# Altium PCB PROC106B_ASCII.PcbDoc (part 2 of 8)
Units mil, origin at the board's own origin, x right, y up, seen from the top; angles counter-clockwise.
Board outline 4498.18 x 1060.53 mil, 8 copper layers (Top Layer, GND1, Sig1, PWR1, PWR2, Sig2, GND2, Bottom Layer), stack 69.602 mil thick; 439 components, 327 nets, 1548 pads, 843 vias.
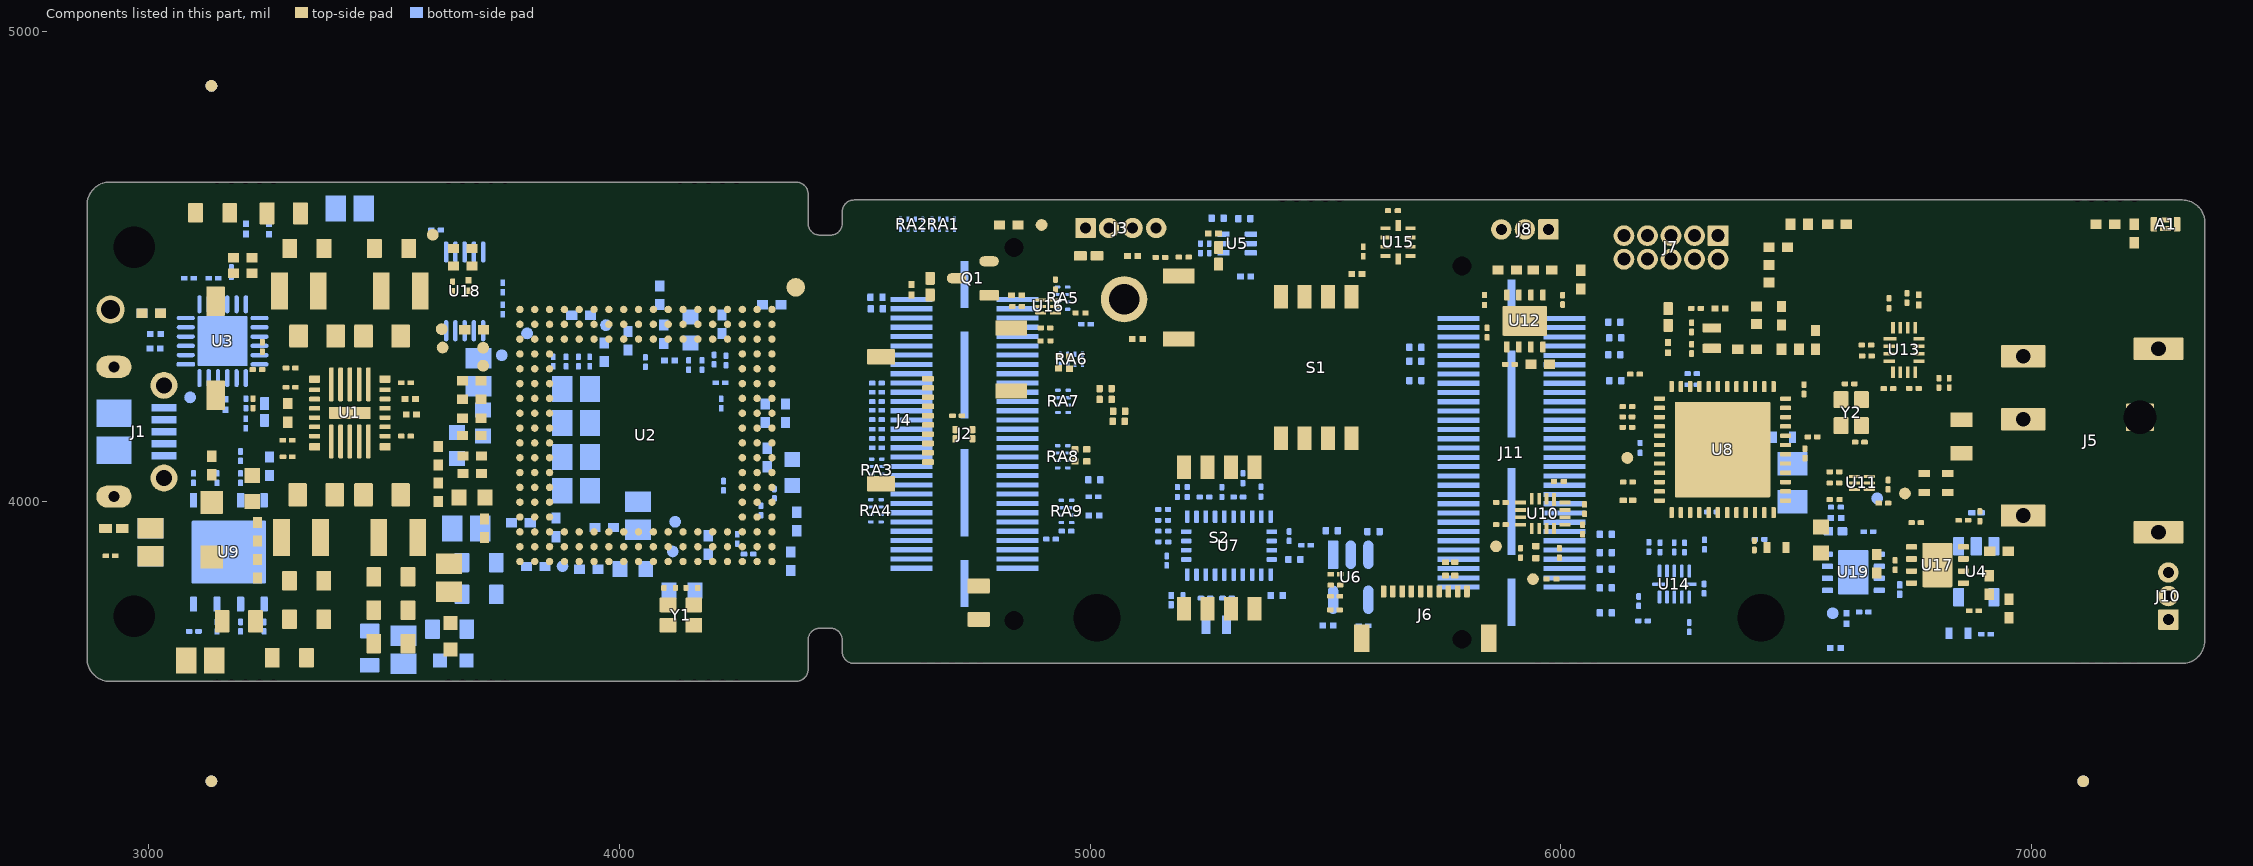
[diagram p8: the components of this part, seen from the top]

## Components (designator, comment, footprint, x,y, rotation, side; value= is the part's Value field where it differs from the comment) (continued)
C125 "CL03A103KA3NNNC" FP-CL03A103KA3NNNC_0201-IPC_C 5252.95,4538.7 r270 bottom
C126 "GCM155R71C104KA55D" 0402L 3691.38,4365.53 r180 top
C127 "GRM033R6YA104KE14D" "FP-GRM033R6YA104KE14D_0201 (0603 Metric)-IPC_C" 6653.18,3936.75 r180 bottom
C128 "GRM033R6YA104KE14D" "FP-GRM033R6YA104KE14D_0201 (0603 Metric)-IPC_C" 6643.28,3766.12 r180 bottom
C129 "CL03A105MO3NRNH" FP-CL03A105MO3NRNH_0201-IPC_C 6719.58,3813.74 r270 bottom
C130 "GCM155R71C104KA55D" 0402L 3967.83,4318.05 r90 bottom
C131 "CGA4J1X7T0J226M125AC" FP-CGA4J1X7T0J226M125AC_0805-MFG 3469.55,3689.64 r90 bottom
D1 "NRVB230LSFT1G" FP-NRVB230LSFT1G_SOD-123F-MFG 3134.01,3940.99 r90 top
Designator1 "Comment" MHNP_M2_PANHEAD_PHILLIPS 2983.52,4883.72 r0 top
Designator1_1 "BRAKE_WAY_HOLES1X2" BRAKE_WAY_HOLES1X2 3205.41,3572.64 r180 bottom
Designator1_2 "Comment" MHNP_M2_PANHEAD_PHILLIPS 2969.58,4541.42 r0 top
Designator2 "BRAKE_WAY_HOLES1X2" BRAKE_WAY_HOLES1X2 4188.97,4725.69 r180 top
Designator2_1 "BRAKE_WAY_HOLES1X2" BRAKE_WAY_HOLES1X2 6010.52,3609.79 r180 bottom
Designator3 "BRAKE_WAY_HOLES1X2" BRAKE_WAY_HOLES1X2 3697.19,4725.69 r180 top
Designator3_2 "BRAKE_WAY_HOLES1X2" BRAKE_WAY_HOLES1X2 5469.11,4687.74 r0 bottom
Designator4 "BRAKE_WAY_HOLES1X2" BRAKE_WAY_HOLES1X2 4706.5,3609.79 r0 top
Designator4_1 "BRAKE_WAY_HOLES1X2" BRAKE_WAY_HOLES1X2 3697.19,3572.64 r180 bottom
Designator5 "BRAKE_WAY_HOLES1X2" BRAKE_WAY_HOLES1X2 7157.87,4687.69 r180 top
Designator5_1 "BRAKE_WAY_HOLES1X2" BRAKE_WAY_HOLES1X2 7157.6,3609.79 r180 bottom
Designator5_2 "BRAKE_WAY_HOLES1X2" BRAKE_WAY_HOLES1X2 4188.97,3572.64 r180 bottom
Designator6 "Comment" MHNP_M2_PANHEAD_PHILLIPS 7259.4,4883.72 r0 top
Designator7 "Comment" MHNP_M2_PANHEAD_PHILLIPS 2983.52,3406.7 r0 top
Designator7_1 "Comment" MHNP_M2_PANHEAD_PHILLIPS 2969.58,3756.91 r0 top
Designator8 "Comment" MHNP_M2_PANHEAD_PHILLIPS 7259.4,3406.7 r0 top
Designator10 "BRAKE_WAY_HOLES1X2" BRAKE_WAY_HOLES1X2 3205.41,4725.69 r180 top
Designator22_1 "Comment" MHNP_2-5 6425,3754.06 r0 bottom
Designator23 "Comment" MHNP_2-5 5014.62,3754.06 r0 bottom
FID1 "Fiducial" FIDUCIAL6.4-20 3133.52,3406.7 r0 top
FID2 "Fiducial" FIDUCIAL6.4-20 3133.52,4883.72 r0 top
FID3 "Fiducial" FIDUCIAL6.4-20 7109.4,3406.7 r0 top
FID4 "Fiducial" FIDUCIAL6.4-20 7109.4,3406.7 r180 bottom
FID5 "Fiducial" FIDUCIAL6.4-20 3133.52,4883.72 r180 bottom
FID6 "Fiducial" FIDUCIAL6.4-20 3133.52,3406.7 r180 bottom
FL2 "BLM15PD300SZ1D" 0402L 3134.06,4077.41 r270 top
FL3 "BLM15PD300SZ1D" 0402L 6670.79,3868.56 r90 top
FL12 "BLM15PD300SZ1D" 0402L 5955.92,4292.41 r0 top
FL22 "BLM15PD300SZ1D" 0402L 4827.36,4588.36 r0 top
J1 "105017-0001" CONN_105017-0001 2979.51,4149.15 r90 bottom
J2 "QSH-030-01-L-D-A" Samtec_QSH-030-01-X-D-A 4733.36,4144.5 r0 bottom locked
J3 "M50-3930442" FP-M50-3930442_HDR4-RECOMMENDED_LAND_PATTERN 5065.29,4621.12 r0 bottom
J4 "51441-1093" FP-51441-1093_CONN_SMD_FFC-0 4585.45,4173.34 r270 top locked
J5 "PJ-051AH" CUI_PJ-051AH 7229.96,4179.69 r0 top
J6 "51441-1093" FP-51441-1093_CONN_SMD_FFC-0 5711.91,3740.17 r0 top
J7 "GRPB052MWCN-RC" FP-GRPB052MWCN-RC_HDR10-MFG 6233.84,4610.83 r180 top
J8 "M50-3930342" FP-M50-3930342_HDR3-MFG 5923.44,4618.25 r180 top
J10 "M50-3930342" FP-M50-3930342_HDR3-MFG 7329.6,3800 r90 top
J11 "QSH-030-01-L-D-A" Samtec_QSH-030-01-X-D-A 5895.12,4104.5 r180 bottom locked
L1 "LQG15HS2N4S02D" IND_LQG15H 6487.22,4324.41 r0 top
L2 "DFE252012PD-R47M" DFE252012P 3535.79,4447.85 r180 top
L3 "DFE252012PD-R47M" DFE252012P 3319.27,4447.85 r0 top
L4 "DFE252012PD-R47M" DFE252012P 3530.36,3924.63 r180 top
L5 "DFE252012PD-R47M" DFE252012P 3323.75,3924.63 r0 top
L6 "LQG15HS2N4S02D" IND_LQG15H 6415.18,4396.46 r90 top
L7 "MLZ2012N6R8LT000" 0805_HV 6491.96,4040.83 r90 bottom
L8 "BLM18HE152SN1D" 0603L 6552.57,3919.1 r90 top
L9 "LQG15HS2N0S02D" IND_LQG15H 6441.85,4484.72 r90 top
L10 "LQG15HS2N0S02D" IND_LQG15H 6506.46,4589.83 r0 top
L11 "MPZ2012S101ATD25" FP-MPZ2012S101ATD25_0805-MFG 3191.81,3746.61 r180 top
L12 "BLM18KG121TH1D" 0603_HV 3641.39,3714.72 r90 top
L13 "MPZ2012S101ATD25" FP-MPZ2012S101ATD25_0805-MFG 3287.13,4612.77 r0 top
L14 "BLM18KG121TH1D" 0603_HV 3647.19,3662.86 r180 bottom
L15 "MPZ2012S101ATD25" FP-MPZ2012S101ATD25_0805-MFG 6850.96,4138.99 r270 top
L16 "MPZ2012S101ATD25" FP-MPZ2012S101ATD25_0805-MFG 4763.29,3786.02 r270 top
LD1 "APHHS1005CGCK" APHHS1005_Green 2926.36,3943.79 r0 top
LD2 "APHHS1005CGCK" APHHS1005_Green 5272.84,4522.72 r270 top
LD3 "APHHS1005CGCK" APHHS1005_Green 4997.02,4522.72 r0 top
LD4 "APHHS1005CGCK" APHHS1005_Green 3246.44,4191.13 r270 bottom
LD5 "APHHS1005CGCK" APHHS1005_Green 4660.11,4457.37 r90 top
LD6 "APHHS1005CGCK" APHHS1005_Green 6227.85,4392.84 r90 top
Q1 "BSS123-7-F" FP-BSS123-7-F_SOT23-IPC_C 4750.81,4475.09 r180 top
R1 "RR0306P-103-D" FP-RR0306P-103-D_0201-IPC_C#1 5643.17,4618.56 r180 top
R2 "ERJ-1GN0R00C" 0201L 4106.92,4300.76 r180 bottom
R3 "ERA-1AEB103C" FP-ERA-1AEB103C_0201-IPC_C 4274.79,3889.16 r180 bottom
R4 "ERJ-1GNF1003C" FP-ERJ-1GNF1003C_0201-IPC_C 3752.34,4408.84 r270 bottom
R5 "ERJ-1GNF1003C" FP-ERJ-1GNF1003C_0201-IPC_C 3752.34,4455.46 r90 bottom
R6 "ERJ-1GNF33R2C" FP-ERJ-1GNF33R2C_0201-IPC_C 3095.35,4050.45 r270 bottom
R7 "ERA-1AEB103C" FP-ERA-1AEB103C_0201-IPC_C 4329.25,4017.43 r270 bottom
R8 "ERA-1AEB103C" FP-ERA-1AEB103C_0201-IPC_C 4221.23,4034.41 r270 bottom
R9 "ERJ-1GNF1003C" FP-ERJ-1GNF1003C_0201-IPC_C 4250.53,3921.56 r270 bottom
R10 "AC0201FR-0720RL" FP-AC0201FR-0720RL_0201-IPC_C 4917.01,3921 r180 bottom
R11 "AC0201FR-0720RL" FP-AC0201FR-0720RL_0201-IPC_C 4950.01,3937.94 r180 bottom
R12 "RC0201JR-070RL" "FP-RC0201JR-070RL_0201 (0603 Metric)-MFG" 4546.15,4434.59 r180 bottom
R13 "RC0201JR-07220RL" 0201L 5261.81,4570.64 r0 top
R14 "RC0201JR-070RL" "FP-RC0201JR-070RL_0201 (0603 Metric)-MFG" 4547.12,4410.25 r180 bottom
R15 "ERJ-1GNJ221C" FP-ERJ-1GNJ221C_0201-IPC_C 3206.52,4166.71 r90 bottom
R16 "RC0201FR-077K87L" 0201L 5566.39,4484.46 r180 top
R17 "RC0201JR-07220RL" 0201L 6227.85,4327.64 r90 top
R18 "RR0306P-103-D" FP-RR0306P-103-D_0201-IPC_C#1 5362.78,4021.8 r270 bottom
R19 "ERA-1AEB103C" FP-ERA-1AEB103C_0201-IPC_C 3610.73,4577.6 r180 bottom
R20 "RR0306P-103-D" FP-RR0306P-103-D_0201-IPC_C#1 6584.18,3988.94 r180 bottom
R21 "ERA-1AEB103C" FP-ERA-1AEB103C_0201-IPC_C 3859.46,4298.05 r270 bottom
R22 "ERA-1AEB103C" FP-ERA-1AEB103C_0201-IPC_C 3886.73,4298.05 r270 bottom
R23 "ERA-1AEB103C" FP-ERA-1AEB103C_0201-IPC_C 3913.05,4298.05 r270 bottom
R24 "CRCW0402200RFKEDHP" FP-CRCW0402200RFKEDHP_0402-IPC_C 6583.18,3937.46 r180 bottom
R25 "ERJ-1GNF4991C" FP-ERJ-1GNF4991C_0201-IPC_C 3301.93,4243.48 r180 top
R26 "ERJ-1GNF4991C" FP-ERJ-1GNF4991C_0201-IPC_C 3295.24,4131.09 r180 top
R27 "RC0201JR-07510RL" 0201L 6606.39,3752.54 r90 bottom
R28 "ERJ-1GN0R00C" 0201L 3555.87,4218.48 r180 top
R29 "CRCW0201100KFKED" 0201L 6584.18,3965.94 r180 bottom
R30 "RC0201JR-070RL" "FP-RC0201JR-070RL_0201 (0603 Metric)-MFG" 5946.67,3893.52 r90 top
R31 "ERJ-1GN0R00C" 0201L 5008.05,3971.4 r180 bottom
R32 "ERJ-1GN0R00C" 0201L 3558.22,4185.79 r180 top
R33 "ERJ-1GNF4991C" FP-ERJ-1GNF4991C_0201-IPC_C 3295.5,4095.96 r180 top
R34 "ERJ-1GNF4991C" FP-ERJ-1GNF4991C_0201-IPC_C 3546.86,4253.13 r0 top
R35 "ERA-1AEB103C" FP-ERA-1AEB103C_0201-IPC_C 3301.93,4284.61 r180 top
R36 "ERA-1AEB103C" FP-ERA-1AEB103C_0201-IPC_C 3546.86,4139.79 r0 top
R37 "ERJ-1GNF1003C" FP-ERJ-1GNF1003C_0201-IPC_C 5007.04,4011.07 r180 bottom
R38 "RC0201FR-074K99L" 0201L 5330.47,4478.82 r180 bottom
R39 "ERJ-1GNJ511C" FP-ERJ-1GNJ511C_0201-IPC_C 2919.28,3885.59 r180 top
R40 "ERJ-1GNF4991C" FP-ERJ-1GNF4991C_0201-IPC_C 3175.78,4488.13 r270 bottom
R41 "ERJ-1GN0R00C" 0201L 3013.92,4326.25 r180 bottom
R42 "RC0201JR-07220RL" 0201L 5090.29,4522.72 r0 top
R43 "ERA-1AEB103C" FP-ERA-1AEB103C_0201-IPC_C 3245.35,3734.95 r270 bottom
R44 "ERA-1AEB103C" FP-ERA-1AEB103C_0201-IPC_C 3095.98,3724.94 r180 bottom
R45 "ERA-1AEB103C" FP-ERA-1AEB103C_0201-IPC_C 3195.34,4097.11 r90 bottom
R46 "ERJ-1GNF33R2C" FP-ERJ-1GNF33R2C_0201-IPC_C 3195.35,3734.95 r90 bottom
R47 "ERJ-1GNF33R2C" FP-ERJ-1GNF33R2C_0201-IPC_C 3145.35,4050.45 r270 bottom
R48 "ERJ-1GNF33R2C" FP-ERJ-1GNF33R2C_0201-IPC_C 3145.35,3734.95 r90 bottom
R49 "ERJ-1GNF33R2C" FP-ERJ-1GNF33R2C_0201-IPC_C 3195.35,4050.45 r270 bottom
R50 "ERJ-1GNJ102C" FP-ERJ-1GNJ102C_0201-IPC_C 3241.63,4329.43 r90 top
R51 "RC0201JR-070RL" "FP-RC0201JR-070RL_0201 (0603 Metric)-MFG" 5327.6,4601.84 r0 bottom
R52 "ERJ-1GNF1961C" FP-ERJ-1GNF1961C_0201-IPC_C 3231.08,4281.06 r0 top
R53 "CRCW04023R83FKED" 0402L 3667.5,4501.24 r180 top
R54 "CRCW04023R83FKED" 0402L 3200.34,4485.56 r0 top
R55 "CRCW04023R83FKED" 0402L 3615.39,4020.22 r270 top
R56 "CRCW04023R83FKED" 0402L 3231.35,3858.36 r270 top
R57 "RC0201JR-070RL" "FP-RC0201JR-070RL_0201 (0603 Metric)-MFG" 5270.8,4602.69 r0 bottom
R58 "RC0201JR-070RL" "FP-RC0201JR-070RL_0201 (0603 Metric)-MFG" 5008.99,4046.94 r180 bottom
R59 "ERA-1AEB103C" FP-ERA-1AEB103C_0201-IPC_C 3936.98,4298.05 r270 bottom
R60 "ERJ-1GN0R00C" 0201L 3014.55,4356.6 r180 bottom
R61 "ERJ-1GN0R00C" 0201L 3163.55,4206.75 r90 bottom
R62 "ERJ-1GN0R00C" 0201L 3206.51,4580.21 r270 bottom
R63 "ERJ-1GN0R00C" 0201L 3255.87,4579.81 r270 bottom
R64 "ERJ-1GNF4991C" FP-ERJ-1GNF4991C_0201-IPC_C 3086.14,4475.15 r0 bottom
R65 "ERA-1AEB103C" FP-ERA-1AEB103C_0201-IPC_C 3137.8,4475.15 r180 bottom
R66 "RC0201JR-070RL" "FP-RC0201JR-070RL_0201 (0603 Metric)-IPC_C" 4991.42,4377.56 r0 bottom
R67 "RC0201JR-070RL" "FP-RC0201JR-070RL_0201 (0603 Metric)-MFG" 5513.34,3938.91 r0 bottom
R68 "RC0201JR-070RL" "FP-RC0201JR-070RL_0201 (0603 Metric)-MFG" 5601.88,3937.06 r180 bottom
R69 "RC0201FR-074K99L" 0201L 5505.11,3737.11 r180 bottom
R70 "RC0201JR-070RL" "FP-RC0201JR-070RL_0201 (0603 Metric)-MFG" 5434,3877.69 r0 bottom
R71 "RC0201JR-070RL" "FP-RC0201JR-070RL_0201 (0603 Metric)-MFG" 5396.26,3801.26 r0 bottom
R72 "RC0201JR-070RL" "FP-RC0201JR-070RL_0201 (0603 METRIC)-IPC_C" 5422.76,3927.24 r270 bottom
R73 "RC0201JR-070RL" "FP-RC0201JR-070RL_0201 (0603 METRIC)-IPC_C" 5458.86,3908 r180 bottom
R74 "RC0201JR-070RL" "FP-RC0201JR-070RL_0201 (0603 METRIC)-IPC_C" 6581.1,4063.92 r0 top
R75 "ERJ-1GNJ102C" FP-ERJ-1GNJ102C_0201-IPC_C 4300.76,3981.67 r270 bottom
R76 "RC0201JR-070RL" "FP-RC0201JR-070RL_0201 (0603 METRIC)-IPC_C" 6210.78,3903.45 r90 bottom
R77 "RR0306P-103-D" FP-RR0306P-103-D_0201-IPC_C#1 5185.3,4021 r270 bottom
R78 "RR0306P-103-D" FP-RR0306P-103-D_0201-IPC_C#1 5155,3984 r0 bottom
R79 "ERJ-1GNF4701C" FP-ERJ-1GNF4701C_0201-IPC_C 6304.11,3815.65 r270 bottom
R80 "RR0306P-103-D" FP-RR0306P-103-D_0201-IPC_C#1 5155.48,3915 r0 bottom
R81 "RR0306P-103-D" FP-RR0306P-103-D_0201-IPC_C#1 5324.41,4050.42 r270 bottom
R82 "RR0306P-103-D" FP-RR0306P-103-D_0201-IPC_C#2 5279.72,4021 r270 bottom
R83 "ERA-1AEB103C" FP-ERA-1AEB103C_0201-IPC_C 4055.26,4296.88 r270 bottom
R84 "ERA-1AEB103C" FP-ERA-1AEB103C_0201-IPC_C 4216.3,4208.84 r90 bottom
R85 "ERA-1AEB103C" FP-ERA-1AEB103C_0201-IPC_C 3645.85,4457.99 r270 top
R86 "RC0201JR-070RL" "FP-RC0201JR-070RL_0201 (0603 METRIC)-IPC_C" 6141.03,4180.57 r0 top
R87 "RC0201JR-070RL" "FP-RC0201JR-070RL_0201 (0603 METRIC)-IPC_C" 6141.18,4202.46 r0 top
R88 "AC0201FR-0720RL" FP-AC0201FR-0720RL_0201-IPC_C 4547.27,4114.97 r0 bottom
R89 "CRCW0201100KFKED" 0201L 6338.19,4411.08 r0 top
R90 "RC0201JR-070RL" "FP-RC0201JR-070RL_0201 (0603 METRIC)-IPC_C" 6278.99,4249 r0 bottom
R91 "RC0201JR-070RL" "FP-RC0201JR-070RL_0201 (0603 METRIC)-IPC_C" 6422.16,3920.53 r180 bottom
R92 "CRCW0201100KFKED" 0201L 6583.22,3689.74 r0 bottom
R93 "RR0306P-103-D" FP-RR0306P-103-D_0201-IPC_C#1 5206.3,4021 r90 bottom
R94 "RR0306P-103-D" FP-RR0306P-103-D_0201-IPC_C#1 5995.7,4043.69 r0 top
R95 "RR0306P-103-D" FP-RR0306P-103-D_0201-IPC_C#1 5979.95,3836.09 r0 top
R96 "RR0306P-103-D" FP-RR0306P-103-D_0201-IPC_C#1 5155.48,3938 r180 bottom
R97 "RC0201JR-070RL" "FP-RC0201JR-070RL_0201 (0603 METRIC)-IPC_C" 5314.73,4010.48 r0 bottom
R98 "RR0306P-103-D" FP-RR0306P-103-D_0201-IPC_C#1 5155,3961 r180 bottom
R99 "RC0201JR-070RL" "FP-RC0201JR-070RL_0201 (0603 METRIC)-IPC_C" 5996.83,3891.7 r270 top
R100 "RC0201JR-070RL" "FP-RC0201JR-070RL_0201 (0603 METRIC)-IPC_C" 5872.42,3998.82 r0 top
R101 "RC0201JR-070RL" "FP-RC0201JR-070RL_0201 (0603 METRIC)-IPC_C" 6046.19,3941.56 r270 top
R102 "RC0201JR-070RL" "FP-RC0201JR-070RL_0201 (0603 METRIC)-IPC_C" 6278.99,4272.45 r0 bottom
R103 "ERJ-1GN0R00C" 0201L 3679.35,4459.54 r270 top
R104 "RR0306P-103-D" FP-RR0306P-103-D_0201-IPC_C#1 6581.47,4005 r180 top
R105 "RC0201JR-070RL" "FP-RC0201JR-070RL_0201 (0603 METRIC)-IPC_C" 6685.03,3997.34 r180 top
R106 "RC0201JR-070RL" "FP-RC0201JR-070RL_0201 (0603 METRIC)-IPC_C" 6695.04,4036.52 r90 top
R107 "RC0201JR-07510RL" 0201L 4620.57,4450.68 r270 top
R108 "RC0201JR-07510RL" 0201L 4843.99,4439.06 r180 top
R110 "RR0306P-103-D" FP-RR0306P-103-D_0201-IPC_C#1 6168.27,4114.75 r270 bottom
R111 "RC0201JR-07220RL" 0201L 5100.51,4345.88 r180 top
R112 "RC0201JR-070RL" "FP-RC0201JR-070RL_0201 (0603 METRIC)-IPC_C" 5872.42,3951.7 r0 top
R113 "RC0201JR-070RL" "FP-RC0201JR-070RL_0201 (0603 METRIC)-IPC_C" 5914.31,3891.7 r90 top
R114 "CRCW040261R9FKED" 0402L 6930.63,3895.33 r180 top
R115 "RC0201JR-070RL" "FP-RC0201JR-070RL_0201 (0603 Metric)-IPC_C" 6854.79,3961 r0 top
R116 "RC0201JR-070RL" "FP-RC0201JR-070RL_0201 (0603 Metric)-IPC_C" 6754.79,3956 r0 top
R117 "CRCW040261R9FKED" 0402L 6909.66,3823.52 r270 top
R118 "RR0306P-103-D" FP-RR0306P-103-D_0201-IPC_C#1 6696.81,4422 r90 top
R119 "CRCW040261R9FKED" 0402L 5885.96,4492.77 r0 top
R120 "RC0201JR-070RL" "FP-RC0201JR-070RL_0201 (0603 Metric)-IPC_C" 6802.81,4252.99 r90 top
R121 "RC0201JR-070RL" "FP-RC0201JR-070RL_0201 (0603 METRIC)-IPC_C" 6649.04,4333.23 r180 top
R122 "RR0306P-103-D" FP-RR0306P-103-D_0201-IPC_C#1 5837.64,4429.06 r270 top
R123 "RC0201JR-070RL" "FP-RC0201JR-070RL_0201 (0603 METRIC)-IPC_C" 5843.14,4359.71 r90 top
R124 "RR0306P-103-D" FP-RR0306P-103-D_0201-IPC_C#1 4905.31,4342.12 r0 top
R125 "RR0306P-103-D" FP-RR0306P-103-D_0201-IPC_C#1 5198.85,4520.03 r180 top
R126 "CRCW040261R9FKED" 0402L 5960.92,4492.48 r0 top
R127 "RC0201JR-070RL" "FP-RC0201JR-070RL_0201 (0603 METRIC)-IPC_C" 6649.8,4310 r0 top
R128 "RC0201JR-070RL" "FP-RC0201JR-070RL_0201 (0603 METRIC)-IPC_C" 6695.72,4240.71 r180 top
R129 "RC0201JR-070RL" "FP-RC0201JR-070RL_0201 (0603 METRIC)-IPC_C" 5149.26,4519.45 r180 top
R130 "AC0201FR-0720RL" FP-AC0201FR-0720RL_0201-IPC_C 4547.27,4134.63 r0 bottom
R131 "RC0201JR-070RL" "FP-RC0201JR-070RL_0201 (0603 METRIC)-IPC_C" 6321.17,3978.41 r180 bottom
R132 "AC0201FR-0720RL" FP-AC0201FR-0720RL_0201-IPC_C 4547.27,4154.34 r0 bottom
R133 "AC0201FR-0720RL" FP-AC0201FR-0720RL_0201-IPC_C 4547.27,4174.75 r0 bottom
R134 "RR0306P-103-D" FP-RR0306P-103-D_0201-IPC_C#1 6889.73,3969.51 r90 top
R135 "AC0201FR-0720RL" FP-AC0201FR-0720RL_0201-IPC_C 4547.27,4194.78 r0 bottom
R136 "RC0201JR-070RL" "FP-RC0201JR-070RL_0201 (0603 Metric)-IPC_C" 6749.82,4241 r0 top
R137 "AC0201FR-0720RL" FP-AC0201FR-0720RL_0201-IPC_C 4547.27,4213.11 r0 bottom
R138 "AC0201FR-0720RL" FP-AC0201FR-0720RL_0201-IPC_C 4547.27,4233.08 r0 bottom
R139 "RC0201JR-070RL" "FP-RC0201JR-070RL_0201 (0603 Metric)-IPC_C" 6824.81,4252.99 r270 top
R140 "AC0201FR-0720RL" FP-AC0201FR-0720RL_0201-IPC_C 4547.27,4252.4 r0 bottom
R141 "RC0201FR-074K99L" 0201L 6760.03,4429.26 r90 top
R142 "RC0201JR-070RL" "FP-RC0201JR-070RL_0201 (0603 Metric)-MFG" 4992.71,4098.76 r270 top
R143 "RC0201JR-070RL" "FP-RC0201JR-070RL_0201 (0603 Metric)-MFG" 4967.77,4098.76 r270 top
R144 "RC0201JR-070RL" "FP-RC0201JR-070RL_0201 (0603 Metric)-MFG" 5061.58,4192.66 r0 top
R145 "RC0201JR-070RL" "FP-RC0201JR-070RL_0201 (0603 Metric)-MFG" 5060.48,4171.22 r0 top
R146 "RC0201JR-070RL" "FP-RC0201JR-070RL_0201 (0603 Metric)-MFG" 5032.8,4217.79 r0 top
R147 "RC0201JR-070RL" "FP-RC0201JR-070RL_0201 (0603 Metric)-MFG" 5032.8,4240.79 r0 top
R148 "RC0201JR-070RL" "FP-RC0201JR-070RL_0201 (0603 Metric)-MFG" 4932.76,4296.62 r90 top
R149 "RC0201JR-070RL" "FP-RC0201JR-070RL_0201 (0603 Metric)-MFG" 4956.17,4295.87 r90 top
R150 "RC0201JR-070RL" "FP-RC0201JR-070RL_0201 (0603 Metric)-MFG" 6113.61,4381.76 r0 bottom
R151 "RC0201JR-070RL" "FP-RC0201JR-070RL_0201 (0603 Metric)-MFG" 6115.41,4348.48 r0 bottom
R152 "RC0201JR-070RL" "FP-RC0201JR-070RL_0201 (0603 Metric)-MFG" 5690.93,4328.4 r0 bottom
R153 "RC0201JR-070RL" "FP-RC0201JR-070RL_0201 (0603 Metric)-MFG" 6113.32,4312.59 r0 bottom
R154 "RC0201JR-070RL" "FP-RC0201JR-070RL_0201 (0603 Metric)-MFG" 5690.93,4298.93 r0 bottom
R155 "RC0201JR-070RL" "FP-RC0201JR-070RL_0201 (0603 Metric)-MFG" 6115.55,4257.57 r0 bottom
R157 "RC0201JR-070RL" "FP-RC0201JR-070RL_0201 (0603 Metric)-MFG" 5690.93,4257.72 r0 bottom
R158 "ERJ-1GNF8252C" FP-ERJ-1GNF8252C_0201-IPC_C 4175.56,4290.74 r270 bottom
R159 "ERJ-1GNJ751C" FP-ERJ-1GNJ751C_0201-IPC_C 4201.23,4302.15 r90 bottom
R160 "RC0201JR-070RL" "FP-RC0201JR-070RL_0201 (0603 METRIC)-IPC_C" 6262.64,3903.15 r90 bottom
R161 "RC0201JR-070RL" "FP-RC0201JR-070RL_0201 (0603 METRIC)-IPC_C" 6141.18,4158.46 r0 top
R166 "RC0201JR-070RL" "FP-RC0201JR-070RL_0201 (0603 METRIC)-IPC_C" 6240.62,3903.59 r90 bottom
R168 "RC0201JR-070RL" "FP-RC0201JR-070RL_0201 (0603 METRIC)-IPC_C" 6186.75,3904.39 r90 bottom
R170 "ERJ-1GNF8252C" FP-ERJ-1GNF8252C_0201-IPC_C 4214.74,4253.13 r180 bottom
R171 "ERJ-1GNJ751C" FP-ERJ-1GNJ751C_0201-IPC_C 4226.45,4300.41 r90 bottom
R172 "ERJ-1GNF8252C" FP-ERJ-1GNF8252C_0201-IPC_C 3206.71,4209.45 r270 bottom
R174 "ERJ-1GNF7871C" FP-ERJ-1GNF7871C_0201-IPC_C 4147.23,4290.74 r270 bottom
R176 "ERJ-1GNF7871C" FP-ERJ-1GNF7871C_0201-IPC_C 3221.71,4209.45 r270 top
R177 "RR0306P-103-D" FP-RR0306P-103-D_0201-IPC_C#1 4979.62,4401.5 r180 top
R178 "RR0306P-103-D" FP-RR0306P-103-D_0201-IPC_C#1 4926.29,4461.7 r270 top
R180 "ERJ-1GNF4701C" FP-ERJ-1GNF4701C_0201-IPC_C 6165.19,3789.15 r270 bottom
R181 "ERJ-1GNF4701C" FP-ERJ-1GNF4701C_0201-IPC_C 5520.05,3770.65 r180 top
R182 "RC0201JR-070RL" "FP-RC0201JR-070RL_0201 (0603 METRIC)-IPC_C" 4717.71,4183.18 r180 top
R183 "RC0201JR-070RL" "FP-RC0201JR-070RL_0201 (0603 METRIC)-IPC_C" 5520.61,3799.62 r180 top
R184 "RC0201JR-070RL" "FP-RC0201JR-070RL_0201 (0603 METRIC)-IPC_C" 5521.16,3823.28 r180 top
R185 "RC0201JR-070RL" "FP-RC0201JR-070RL_0201 (0603 METRIC)-IPC_C" 5521,3846.49 r180 top
R186 "RC0201JR-070RL" "FP-RC0201JR-070RL_0201 (0603 Metric)-MFG" 6095.54,3931.22 r0 bottom
R187 "RC0201JR-070RL" "FP-RC0201JR-070RL_0201 (0603 Metric)-MFG" 6095.54,3892.26 r0 bottom
R188 "RC0201JR-070RL" "FP-RC0201JR-070RL_0201 (0603 Metric)-MFG" 6095.54,3857.41 r0 bottom
R189 "RC0201JR-070RL" "FP-RC0201JR-070RL_0201 (0603 Metric)-MFG" 6095.54,3817.56 r0 bottom
R190 "RC0201JR-070RL" "FP-RC0201JR-070RL_0201 (0603 Metric)-MFG" 6095.54,3764.53 r0 bottom
RA1 "EXB-18VR000X" FP-EXB-18VR000X_0502-MFG 4688.09,4589.75 r0 bottom
RA2 "EXB-18VR000X" FP-EXB-18VR000X_0502-MFG 4620.86,4589.75 r0 bottom
RA3 "EXB-18VR000X" FP-EXB-18VR000X_0502-MFG 4546.77,4067.23 r90 bottom
RA4 "EXB-18VR000X" FP-EXB-18VR000X_0502-MFG 4545.1,3981.11 r90 bottom
RA5 "EXB-18VR000X" FP-EXB-18VR000X_0502-MFG 4941.51,4432.71 r90 bottom locked
RA6 "EXB-18VR000X" FP-EXB-18VR000X_0502-MFG 4960.21,4302.91 r0 bottom
RA7 "EXB-18VR000X" FP-EXB-18VR000X_0502-MFG 4942.52,4213.65 r90 bottom locked
RA8 "EXB-18VR000X" FP-EXB-18VR000X_0502-MFG 4941.86,4095.87 r90 bottom locked
RA9 "EXB-18VR000X" FP-EXB-18VR000X_0502-MFG 4949.85,3979.76 r90 bottom locked
S1 "218-4LPST" SW_218-4LPST 5480.37,4285.46 r90 top
S2 "218-4LPST" SW_218-4LPST 5274.37,3923.46 r90 top locked
S3 "CHS-01TA" FP-CHS-01TA_SMT_SW_5MM4_2MM5-MFG 3142.31,4326.42 r90 top
SW2 "B3U-1000P" SW_B3U-1000P 4832.84,4302.77 r270 top
SW3 "B3U-1000P" SW_B3U-1000P 5188.73,4412.81 r270 top
TP2 "TESTPOINT" TP_25MIL-SMT 4113.44,3894.78 r180 bottom
TP3 "TESTPOINT" TP_25MIL-SMT 4118.39,3957.8 r180 bottom
TP4 "TESTPOINT" TP_25MIL-SMT 6671.71,4007.65 r180 bottom
TP5 "TESTPOINT" TP_25MIL-SMT 3603.84,4567.52 r180 top
TP6 "TESTPOINT" TP_25MIL-SMT 3750.12,4311.58 r90 bottom
TP7 "TESTPOINT" TP_25MIL-SMT 3804,4358 r0 bottom
TP8 "TESTPOINT" TP_25MIL-SMT 3710.6,4327.53 r0 top
TP9 "TESTPOINT" TP_25MIL-SMT 3710.6,4289.4 r0 top
TP10 "TESTPOINT" TP_25MIL-SMT 6577.18,3763.46 r270 bottom
TP11 "TP_SM_1MM" TP_SM_1MM 4374.76,4455.87 r180 top
TP12 "TESTPOINT" TP_VIA_060RND040 2919.28,4408.64 r90 top
TP13 "TESTPOINT" TP_25MIL-SMT 4896.84,4588.36 r270 top
TP14 "TESTPOINT" TP_25MIL-SMT 3971.52,4375.57 r270 bottom
TP15 "TESTPOINT" TP_25MIL-SMT 6730.81,4018 r90 top
TP16 "TESTPOINT" TP_25MIL-SMT 6141.18,4093.46 r180 top
TP17 "TESTPOINT" TP_25MIL-SMT 3879.25,3863.39 r180 bottom
TP18 "TESTPOINT" TP_25MIL-SMT 3622.56,4367.08 r180 top
TP19 "TESTPOINT" TP_25MIL-SMT 3624.53,4327.96 r180 top
TP20 "4953" FP-4953_HDR1-MFG 5072.16,4430.47 r180 bottom locked
TP26 "TESTPOINT" TP_25MIL-SMT 3088.22,4222.02 r0 bottom
TP27 "TESTPOINT" TP_25MIL-SMT 5862.18,3905.74 r270 top
TP46 "TESTPOINT" TP_25MIL-SMT 5940.71,3836.09 r270 top
U1 "LP87524JRNFRQ1" RNF0026C 3427.48,4189 r180 top
U2 "AWR1843AoPBGALP" ALP0180A-MFG 4056.48,4141.13 r180 top
U3 "CP2105-F01-GMR" FP-CP2105-F01-GMR_QFN24-EP-IPC_A 3157.31,4341.42 r0 bottom
U4 "TPS79330DBVR" DBV0005A_N 6882.18,3851.63 r270 bottom
U5 "TMP112AQDRLRQ1" DRL0006A 5312.36,4548.71 r180 bottom
U6 "CAT24C08TDI-GT3" FP-CAT24C08TDI-GT3_TSOT-23-5-IPC_A 5553.54,3840.01 r270 bottom
U7 "BNO085" FP-BNO085_LGA28-MFG 5294.88,3907.22 r270 bottom
U8 "CC2642R1FRGZR" RGZ0048A 6343.38,4111.11 r270 top
U9 "MX25V1635FZNQ" WSON-8L_6x5MM_EP 3170.35,3893.29 r90 bottom locked
U10 "TCA6408ARSVR" RSV0016A 5961.56,3975.2 r270 top
U11 "SN74LVC1G3157DSFR" DSF0006A 6639.32,4040.29 r180 top
U12 "TCAN1042HGVDRBRQ1" DRB0008F 5923.44,4384.46 r90 top
U13 "TS3A5018RSVR" RSV0016A 6728.94,4322.76 r0 top
U14 "TXB0104QRUTRQ1" RUT0012A 6241.04,3825.36 r90 bottom
U15 "TS5A23157RSER" RSE0010A 5654.19,4551.79 r180 top
U16 "SN74LVC1G11DSFR" DSF0006A-MFG 4910.54,4415.28 r180 top
U17 "TCAN1042HGVDRBRQ1" DRB0008F 6799.78,3866 r0 top
U18 "TS5A23157QDGSRQ1" DGS0010A_L 3671.35,4447.33 r270 bottom
U19 "TPS2115ADRBR" DRB0008B 6621.18,3850.46 r0 bottom
Y1 "FW4000044Q" FP-FW4000044Q_4-SMD-2.0x1.6mm-MFG 4130.76,3759.63 r180 top
Y2 "CX2016DB48000C0WPLA2" FP-CX2016DB48000C0WPLA2_SMD4-MFG 6616.71,4189.85 r270 top
Y3 "ABS05W-32.768KHZ-D-2-T" FP-ABS05W-32.768KHZ-D-2-T_XTAL_SMT_1MM6_1MM0-MFG 6320.71,4347.93 r270 top
Y4 "ABS05W-32.768KHZ-D-2-T" FP-ABS05W-32.768KHZ-D-2-T_XTAL_SMT_1MM6_1MM0-MFG 5267.82,3738.88 r0 bottom
ZZ1 "This Assembly Note is for PCB labels only" AssemblyNoteLabel 2349.62,2814.36 r0 top
ZZ2 "These assemblies are ESD sensitive, ESD precautions shall be observed." AssemblyNote 2346.49,2738.89 r0 top
ZZ3 "These assemblies must be clean and free from flux and all contaminants. Use of no clean flux is not acceptable." AssemblyNote 2346.43,2653.5 r0 top
ZZ4 "These assemblies must comply with workmanship standards IPC-A-610 Class 2, unless otherwise specified." AssemblyNote 2343.34,2567.2 r0 top
ZZ5.1 "Cut the thermal pad(Part Number#GPVOUS-0.125-AC-0816) for the shape and size of the inner surface of the heatsink(Part Number#MCH065) and paste it on the inner surface of the heatsink;" AssemblyNote 2340.76,2492.7 r0 top
ZZ5.2 "Bring the heatsink onto the PCB bottom side (Opposite side of AOP device). Match the teeth in the heatsink with break-away area in the PCB and press the heatsink onto the PCB slightly so as thermal pad is spread all over the area" AssemblyNote 2343.41,2409 r0 top

## Footprints (in the part's own frame and the unit in brackets; to place one, negate y for a bottom-side part, rotate by r counter-clockwise, add the part's x,y. Pads: shape width x height; smd on the part's side, far side on the other; paste and mask are expansions set on the pad)
0201L [mm] "Data from Kemet datasheet CC101_COM dated 7/28/11"
  rect 0.36x0.32 smd mask+0: 1(-0.28,0) 2(0.28,0)
0402_070 [mil] "SMD, 2-Leads, Body 1.2x0.7mm, Height 0.7mm"
  rect 15x24 smd: 1(-20,0) 2(20,0)
0402L [mm] "0402 from SM-752 data"
  rect 0.6x0.5 smd: 1(-0.5,0) 2(0.5,0)
0402S [mil] "Based on C0402S footprint from PADS legacy"
  rect 15x24 smd: 1(-20,0) 2(20,0)
0603_HV [mil] "Ernesto recommended land pattern.  26 mil between pads."
  rect 30x30 smd: 1(-28,0) 2(28,0)
  silkscreen extent -52,-24 52,24
0603L [mm] "0603 from SM-752 data"
  rect 0.8x0.85 smd: 1(-0.7,0) 2(0.7,0)
  silkscreen extent -0.07,-0.33 0.07,0.33
0805_HV [mil] "0805 with 30mil clearance between pads"
  rect 50x63 smd: 1(-40,0) 2(40,0)
  silkscreen extent -74,-40 74,40
0805_HV1 [mm] "Custom footprint based on analyzing multiple manufacturer recommendations"
  rrect10% 1x1.25 smd: 1(-1,0) 2(1,0)
  silkscreen extent -0.2,-0.75 0.2,0.75
0805L [mm] "0805 from SM-752 data"
  rect 1.1x1.4 smd: 1(-0.75,0) 2(0.75,0)
ALP0180A-MFG [mm]
  round 0.4 smd paste+0 mask+0: A1(-6.8,6.8) A2(-6,6.8) A3(-5.2,6.8) A4(-4.4,6.8) A5(-3.6,6.8) A6(-2.8,6.8) A7(-2,6.8) A8(-1.2,6.8) A9(-0.4,6.8) A10(0.4,6.8) A11(1.2,6.8) A12(2,6.8) A13(2.8,6.8) A14(3.6,6.8) A15(4.4,6.8) A16(5.2,6.8) A17(6,6.8) A18(6.8,6.8) B1(-6.8,6) B2(-6,6) B3(-5.2,6) B4(-4.4,6) B5(-3.6,6) B6(-2.8,6) B7(-2,6) B8(-1.2,6) B9(-0.4,6) B10(0.4,6) B11(1.2,6) B12(2,6) B13(2.8,6) B14(3.6,6) B15(4.4,6) B16(5.2,6) B17(6,6) B18(6.8,6) C1(-6.8,5.2) C2(-6,5.2) C3(-5.2,5.2) C4(-4.4,5.2) C5(-3.6,5.2) C6(-2.8,5.2) C7(-2,5.2) C8(-1.2,5.2) C9(-0.4,5.2) C10(0.4,5.2) C11(1.2,5.2) C12(2,5.2) C13(2.8,5.2) C14(3.6,5.2) C15(4.4,5.2) C16(5.2,5.2) C17(6,5.2) C18(6.8,5.2) D1(-6.8,4.4) D2(-6,4.4) D3(-5.2,4.4) D16(5.2,4.4) D17(6,4.4) D18(6.8,4.4) E1(-6.8,3.6) E2(-6,3.6) E3(-5.2,3.6) E16(5.2,3.6) E17(6,3.6) E18(6.8,3.6) F1(-6.8,2.8) F2(-6,2.8) F3(-5.2,2.8) F16(5.2,2.8) F17(6,2.8) F18(6.8,2.8) G1(-6.8,2) G2(-6,2) G3(-5.2,2) G16(5.2,2) G17(6,2) G18(6.8,2) H1(-6.8,1.2) H2(-6,1.2) H3(-5.2,1.2) H16(5.2,1.2) H17(6,1.2) H18(6.8,1.2) J1(-6.8,0.4) J2(-6,0.4) J3(-5.2,0.4) J16(5.2,0.4) J17(6,0.4) J18(6.8,0.4) K1(-6.8,-0.4) K2(-6,-0.4) K3(-5.2,-0.4) K16(5.2,-0.4) K17(6,-0.4) K18(6.8,-0.4) L1(-6.8,-1.2) L2(-6,-1.2) L3(-5.2,-1.2) L16(5.2,-1.2) L17(6,-1.2) L18(6.8,-1.2) M1(-6.8,-2) M2(-6,-2) M3(-5.2,-2) M16(5.2,-2) M17(6,-2) M18(6.8,-2) N1(-6.8,-2.8) N2(-6,-2.8) N3(-5.2,-2.8) N16(5.2,-2.8) N17(6,-2.8) N18(6.8,-2.8) P1(-6.8,-3.6) P2(-6,-3.6) P3(-5.2,-3.6) P16(5.2,-3.6) P17(6,-3.6) P18(6.8,-3.6) R1(-6.8,-4.4) R2(-6,-4.4) R3(-5.2,-4.4) R16(5.2,-4.4) R17(6,-4.4) R18(6.8,-4.4) T1(-6.8,-5.2) T2(-6,-5.2) T3(-5.2,-5.2) T4(-4.4,-5.2) T5(-3.6,-5.2) T6(-2.8,-5.2) T7(-2,-5.2) T8(-1.2,-5.2) T9(-0.4,-5.2) T10(0.4,-5.2) T11(1.2,-5.2) T12(2,-5.2) T13(2.8,-5.2) T14(3.6,-5.2) T15(4.4,-5.2) T16(5.2,-5.2) T17(6,-5.2) T18(6.8,-5.2) U1(-6.8,-6) U2(-6,-6) U3(-5.2,-6) U4(-4.4,-6) U5(-3.6,-6) U6(-2.8,-6) U7(-2,-6) U8(-1.2,-6) U9(-0.4,-6) U10(0.4,-6) U11(1.2,-6) U12(2,-6) U13(2.8,-6) U14(3.6,-6) U15(4.4,-6) U16(5.2,-6) U17(6,-6) U18(6.8,-6) V1(-6.8,-6.8) V2(-6,-6.8) V3(-5.2,-6.8) V4(-4.4,-6.8) V5(-3.6,-6.8) V6(-2.8,-6.8) V7(-2,-6.8) V8(-1.2,-6.8) V9(-0.4,-6.8) V10(0.4,-6.8) V11(1.2,-6.8) V12(2,-6.8) V13(2.8,-6.8) V14(3.6,-6.8) V15(4.4,-6.8) V16(5.2,-6.8) V17(6,-6.8) V18(6.8,-6.8)
  silkscreen extent -8.3,-7.55 7.55,7.55
APHHS1005_Green [mm] "SMD, 2-Leads, Body 1x0.5mm"
  rrect20% 0.7x0.5 smd: 1(-0.45,0) 2(0.45,0)
  silkscreen extent -0.8,-0.65 1.12,0.65
AssemblyNote [mil] "Assembly Note"
AssemblyNoteLabel [mil] "Assembly Note for PCB Labels"
BRAKE_WAY_HOLES1X2 [mil]
CONN_105017-0001 [mm] "Molex Micro USB-B"
  rect 0.4x1.35 smd: 1(-1.3,1.35) 2(-0.65,1.35) 3(0,1.35) 4(0.65,1.35) 5(1.3,1.35)
  oval 1.2x1.9 hole 0.6 slot 1.3 at 90 deg: 6(-3.5,-1.35) 9(3.5,-1.35)
  rect 1.5x1.9 smd: 7(-1,-1.35) 8(1,-1.35)
  round 1.45 hole 0.85: 10(2.5,1.35) 11(-2.5,1.35)
  Top Layer region: 3.5,-2.3 2.3,-2.3 2.3,-0.4 3.5,-0.4
  Top Layer region: -3.5,-0.4 -2.3,-0.4 -2.3,-2.3 -3.5,-2.3
  silkscreen extent -4.1,-0.2 4.1,1.4
CUI_PJ-051AH [mm] "DC Power Jack, R/A, TH"
  rrect8% 2.4x1.2 hole 0.8 square: 1(-6.3,3.3) 2(-6.3,-5.3) 3(-6.3,-0.1)
  rrect8% 2.7x1.2 hole 0.8 square: 4(1,-6.2) 5(1,3.7)
  rrect7% 1.5x1.5 hole 1.8 square unplated mask+0: MH1(0,0)
DBV0005A_N [mm] "SOT23, 5-Leads, Body 2.9x1.6mm, Pitch 0.95mm, Lead Span 2.8mm, IPC Medium Density"
  rrect17% 1x0.6 smd: 1(-1.375,0.95) 2(-1.375,0) 3(-1.375,-0.95) 4(1.375,-0.95) 5(1.375,0.95)
  silkscreen extent -0.25,-1.55 0.25,1.55
DFE252012P [mm] "TOKO, Pad sizes increased as per request"
  rect 0.9x2 smd: 1(-1.05,0) 2(1.05,0)
  silkscreen extent -0.3,-1.2 0.3,1.2
DGS0010A_L [mm] "TSSOP, 10-Leads, Body 3x3mm, Pitch 0.5mm, IPC High Density"
  oval 1.15x0.25 smd: 1(-2.125,1) 2(-2.125,0.5) 3(-2.125,0) 4(-2.125,-0.5) 5(-2.125,-1) 6(2.125,-1) 7(2.125,-0.5) 8(2.125,0) 9(2.125,0.5) 10(2.125,1)
  silkscreen extent -2.65,-1.55 0.9,1.55
DRB0008B [mm] "SON, 8-Leads, Body 3x3mm, Pitch 0.65mm, Thermal Pad 2.4x1.65mm, TI Recommended"
  rrect33% 0.6x0.3 smd: 1(-1.4,0.975) 2(-1.4,0.325) 3(-1.4,-0.325) 4(-1.4,-0.975) 5(1.4,-0.975) 6(1.4,-0.325) 7(1.4,0.325) 8(1.4,0.975)
  rrect9% 1.47x1.06 on Bottom Paste: 9(0,-0.63) 9(0,0.63)
  rrect6% 1.65x2.4 smd paste-1.2: 9(0,0)
  silkscreen extent -1.73,-1.73 1.73,1.73
DRB0008F [mm] "SON, 8-Leads, Body 3x3mm, Pitch 0.65mm, Thermal Pad 2.4x1.6mm, TI Recommended"
  rrect33% 0.6x0.3 smd: 1(-1.4,0.975) 2(-1.4,0.325) 3(-1.4,-0.325) 4(-1.4,-0.975) 5(1.4,-0.975) 6(1.4,-0.325) 7(1.4,0.325) 8(1.4,0.975)
  rrect9% 1.47x1.07 on Top Paste: 9(0,0.635) 9(0,-0.635)
  rrect6% 1.6x2.4 smd paste-1.2: 9(0,0)
  silkscreen extent -1.73,-1.73 1.73,1.73
DRL0006A [mm] "SOTFL, 6-Flat Leads, Body 1.2x1.6x0.6mm, Pitch 0.5mm, TI recommended"
  rrect33% 0.67x0.3 smd: 1(-0.74,0.5) 2(-0.74,0) 3(-0.74,-0.5) 4(0.74,-0.5) 5(0.74,0) 6(0.74,0.5)
  silkscreen extent -0.9,-0.95 0.5,0.95
DSF0006A [mm] "TI recommended land pattern"
  rrect59% 0.6x0.17 smd mask+0: 1(-0.4,0.35) 2(-0.4,0) 3(-0.4,-0.35) 4(0.4,-0.35) 5(0.4,0) 6(0.4,0.35)
  silkscreen extent -0.6,-0.63 0.6,0.63
DSF0006A-MFG [mm]
  rrect59% 0.6x0.17 smd paste+0 mask+0: 1(-0.4,0.35) 2(-0.4,0) 3(-0.4,-0.35) 4(0.4,-0.35) 5(0.4,0) 6(0.4,0.35)
  silkscreen extent -1.14,-0.85 0.53,1.02
FIDUCIAL6.4-20 [mil]
  round 25 smd mask+0: 1(0,0)
FP-250R05L120JV4T_0201-IPC_C [mm]
  rrect38% 0.363x0.263 smd paste+0 mask+0: 1(-0.25,0) 2(0.25,0)
FP-4953_HDR1-MFG [mm]
  round 2.5 hole 1.65 paste-1000 mask+0: 1(0,0)
FP-51441-1093_CONN_SMD_FFC-0 [mm]
  rrect33% 0.3x0.65 smd paste+0 mask+0: 1(-2.25,1.775) 2(-1.75,1.775) 3(-1.25,1.775) 4(-0.75,1.775) 5(-0.25,1.775) 6(0.25,1.775) 7(0.75,1.775) 8(1.25,1.775) 9(1.75,1.775) 10(2.25,1.775)
  rrect12% 0.85x1.5 smd paste+0 mask+0: 11(-3.425,-0.75) 12(3.425,-0.75)
FP-ABS05W-32.768KHZ-D-2-T_XTAL_SMT_1MM6_1MM0-MFG [mm]
  rrect20% 0.5x1 smd paste+0 mask+0: 1(-0.55,0) 2(0.55,0)
FP-AC0201FR-0720RL_0201-IPC_C [mil]
  rrect38% 13.94x10.34 smd paste+0 mask+0: 1(-10.01,0) 2(10.01,0)
FP-ANT016008LCS2442MA2_SMT_ANT-0 [mm]
  rrect29% 0.35x0.8 smd paste+0 mask+0: 1(-0.625,0) 4(0.625,0)
  rrect38% 0.6x0.26 smd paste+0 mask+0: 2-3(0,-0.235) 5-6(0,0.235)
FP-BNO085_LGA28-MFG [mm]
  rrect40% 0.675x0.25 smd paste+0 mask+0: 1(1.562,2.25) 6(-1.562,2.25) 7(-1.562,1.75) 8(-1.562,1.25) 9(-1.562,0.75) 10(-1.562,0.25) 11(-1.562,-0.25) 12(-1.562,-0.75) 13(-1.562,-1.25) 14(-1.562,-1.75) 15(-1.562,-2.25) 20(1.562,-2.25) 21(1.562,-1.75) 22(1.562,-1.25) 23(1.562,-0.75) 24(1.562,-0.25) 25(1.562,0.25) 26(1.562,0.75) 27(1.562,1.25) 28(1.562,1.75)
  rrect40% 0.25x0.575 smd paste+0 mask+0: 2(0.75,2.312) 3(0.25,2.312) 4(-0.25,2.312) 5(-0.75,2.312) 16(-0.75,-2.312) 17(-0.25,-2.312) 18(0.25,-2.312) 19(0.75,-2.312)
FP-BSS123-7-F_SOT23-IPC_C [mm]
  rrect18% 1.059x0.547 smd paste+0 mask+0: 1(-0.877,0.915)
  rrect100% 1.059x0.547 smd paste+0 mask+0: 2(-0.877,-0.915) 3(0.877,0)
FP-CAT24C08TDI-GT3_TSOT-23-5-IPC_A [mm]
  rrect18% 1.54x0.566 smd paste+0 mask+0: 1(-1.216,0.95)
  rrect100% 1.54x0.566 smd paste+0 mask+0: 2(-1.216,0) 3(-1.216,-0.95) 4(1.216,-0.95) 5(1.216,0.95)
FP-CGA1A2C0G1H4R7C030BA_0201-IPC_C [mil]
  rrect35% 11.14x12.52 smd paste+0 mask+0: 1(-12.5,0) 2(12.5,0)
  silkscreen extent -18,-24 18,14
FP-CGA4J1X7T0J226M125AC_0805-MFG [mm]
  rrect13% 0.8x1.05 smd paste+0 mask+0: 1(-0.925,0) 2(0.925,0)
  silkscreen extent -0.15,-0.77 0.15,0.77
FP-CHS-01TA_SMT_SW_5MM4_2MM5-MFG [mm]
  rrect10% 1.6x1 smd paste+0 mask+0: 1(-2.54,0) 2(2.54,0)
FP-CL03A103KA3NNNC_0201-IPC_C [mil]
  rrect38% 13.94x10.34 smd paste+0 mask+0: 1(-10.01,0) 2(10.01,0)
FP-CL03A105MO3NRNH_0201-IPC_C [mil]
  rrect33% 15.83x11.94 smd paste+0 mask+0: 1(-9.87,0) 2(9.87,0)
FP-CP2105-F01-GMR_QFN24-EP-IPC_A [mm]
  rrect42% 0.979x0.239 smd paste+0 mask+0: 1(-1.99,1.25)
  rrect100% 0.979x0.239 smd paste+0 mask+0: 2(-1.99,0.75) 3(-1.99,0.25) 4(-1.99,-0.25) 5(-1.99,-0.75) 6(-1.99,-1.25) 13(1.99,-1.25) 14(1.99,-0.75) 15(1.99,-0.25) 16(1.99,0.25) 17(1.99,0.75) 18(1.99,1.25)
  rrect100% 0.239x0.979 smd paste+0 mask+0: 7(-1.25,-1.99) 8(-0.75,-1.99) 9(-0.25,-1.99) 10(0.25,-1.99) 11(0.75,-1.99) 12(1.25,-1.99) 19(1.25,1.99) 20(0.75,1.99) 21(0.25,1.99) 22(-0.25,1.99) 23(-0.75,1.99) 24(-1.25,1.99)
  rrect4% 2.7x2.7 smd paste-1000 mask+0: 25(0,0)
FP-CRCW0402200RFKEDHP_0402-IPC_C [mil]
  rrect21% 20.29x18.6 smd paste+0 mask+0: 1(-14.9,0) 2(14.9,0)
FP-CX2016DB48000C0WPLA2_SMD4-MFG [mm]
  rrect13% 0.9x0.8 smd paste+0 mask+0: 1(-0.7,-0.55) 2(0.7,-0.55) 3(0.7,0.55) 4(-0.7,0.55)
  silkscreen extent -1.9,-1.35 1.05,1.35
FP-ERA-1AEB103C_0201-IPC_C [mil]
  rrect38% 13.94x10.34 smd paste+0 mask+0: 1(-10.01,0) 2(10.01,0)
  silkscreen extent -17,-22 17,22
FP-ERJ-1GNF33R2C_0201-IPC_C [mil]
  rrect38% 13.94x10.34 smd paste+0 mask+0: 1(-10.01,0) 2(10.01,0)
  silkscreen extent -17,-22 17,22
FP-ERJ-1GNF1003C_0201-IPC_C [mil]
  rrect38% 13.94x10.34 smd paste+0 mask+0: 1(-10.01,0) 2(10.01,0)
  silkscreen extent -17,-22 17,22
FP-ERJ-1GNF1961C_0201-IPC_C [mil]
  rrect38% 13.94x10.34 smd paste+0 mask+0: 1(-10.01,0) 2(10.01,0)
  silkscreen extent -17,-22 17,22
FP-ERJ-1GNF4701C_0201-IPC_C [mil]
  rrect38% 13.94x10.34 smd paste+0 mask+0: 1(-10.01,0) 2(10.01,0)
FP-ERJ-1GNF4991C_0201-IPC_C [mil]
  rrect38% 13.94x10.34 smd paste+0 mask+0: 1(-10.01,0) 2(10.01,0)
  silkscreen extent -17,-22 17,12
FP-ERJ-1GNF7871C_0201-IPC_C [mil]
  rrect38% 13.94x10.34 smd paste+0 mask+0: 1(-10.01,0) 2(10.01,0)
  silkscreen extent -17,-12 17,12
FP-ERJ-1GNF8252C_0201-IPC_C [mil]
  rrect38% 13.94x10.34 smd paste+0 mask+0: 1(-10.01,0) 2(10.01,0)
  silkscreen extent -17,-12 17,12
FP-ERJ-1GNJ102C_0201-IPC_C [mil]
  rrect38% 13.94x10.34 smd paste+0 mask+0: 1(-10.01,0) 2(10.01,0)
  silkscreen extent -17,-22 17,22
FP-ERJ-1GNJ221C_0201-IPC_C [mil]
  rrect38% 13.94x10.34 smd paste+0 mask+0: 1(-10.01,0) 2(10.01,0)
  silkscreen extent -17,-22 17,22
FP-ERJ-1GNJ511C_0201-IPC_C [mil]
  rrect38% 13.94x10.34 smd paste+0 mask+0: 1(-10.01,0) 2(10.01,0)
  silkscreen extent -17,-22 17,22
FP-ERJ-1GNJ751C_0201-IPC_C [mil]
  rrect38% 13.94x10.34 smd paste+0 mask+0: 1(-10.01,0) 2(10.01,0)
  silkscreen extent -17,-12 17,12
FP-EXB-18VR000X_0502-MFG [mm]
  rrect57% 0.175x0.3 smd paste+0 mask+0: 1(-0.6,-0.275) 2(-0.2,-0.275) 3(0.2,-0.275) 4(0.6,-0.275) 5(0.6,0.275) 6(0.2,0.275) 7(-0.2,0.275) 8(-0.6,0.275)
FP-FW4000044Q_4-SMD-2.0x1.6mm-MFG [mm]
  rrect13% 0.9x0.8 smd paste+0 mask+0: 1(-0.7,-0.55) 2(0.7,-0.55) 3(0.7,0.55) 4(-0.7,0.55)
  silkscreen extent -1.83,-1.1 1,1.35
"FP-GRM033R6YA104KE14D_0201 (0603 Metric)-IPC_C" [mil]
  rrect38% 13.94x10.34 smd paste+0 mask+0: 1(-10.01,0) 2(10.01,0)
"FP-GRM0335C1H8R0BA01D_0201 (0603 metric)-IPC_C" [mil]
  rrect38% 13.94x10.34 smd paste+0 mask+0: 1(-10.01,0) 2(10.01,0)
FP-GRPB052MWCN-RC_HDR10-MFG [mm]
  rrect9% 1.12x1.12 hole 0.7 paste-1000 mask+0: 1(-2.54,1.15)
  round 1.12 hole 0.7 paste-1000 mask+0: 2(-2.54,2.42) 3(-1.27,1.15) 4(-1.27,2.42) 5(0,1.15) 6(0,2.42) 7(1.27,1.15) 8(1.27,2.42) 9(2.54,1.15) 10(2.54,2.42)
  silkscreen extent -3.77,-0.7 3.42,1.17
FP-M50-3930342_HDR3-MFG [mm]
  rrect9% 1.1x1.1 hole 0.6 paste-1000 mask+0: 1(-1.27,1)
  round 1.1 hole 0.6 paste-1000 mask+0: 2(0,1) 3(1.27,1)
  silkscreen extent -2.15,-0.6 2.15,2.09
FP-M50-3930442_HDR4-RECOMMENDED_LAND_PATTERN [mm]
  rrect9% 1.1x1.1 hole 0.6 paste-1000 mask+0: 1(-1.905,1)
  round 1.1 hole 0.6 paste-1000 mask+0: 2(-0.635,1) 3(0.635,1) 4(1.905,1)
FP-MPZ2012S101ATD25_0805-MFG [mm]
  rrect13% 0.8x1.2 smd paste+0 mask+0: 1(-0.9,0) 2(0.9,0)
  silkscreen extent -0.13,-0.72 0.13,0.72
FP-NRVB230LSFT1G_SOD-123F-MFG [mm]
  rrect8% 1.25x1.22 smd paste+0 mask+0: 1(-1.475,0) 2(1.475,0)
  silkscreen extent -2.8,-0.9 0.48,0.9
"FP-RC0201JR-070RL_0201 (0603 Metric)-IPC_C" [mil]
  rrect38% 13.94x10.34 smd paste+0 mask+0: 1(-10.01,0) 2(10.01,0)
"FP-RC0201JR-070RL_0201 (0603 METRIC)-IPC_C" [mil]
  rrect38% 13.94x10.34 smd paste+0 mask+0: 1(-10.01,0) 2(10.01,0)
"FP-RC0201JR-070RL_0201 (0603 Metric)-MFG" [mm]
  rrect29% 0.35x0.4 smd paste+0 mask+0: 1(-0.325,0) 2(0.325,0)
FP-RR0306P-103-D_0201-IPC_C#1 [mil]
  rrect37% 13.31x10.73 smd paste+0 mask+0: 1(-10.52,0) 2(10.52,0)
FP-RR0306P-103-D_0201-IPC_C#2 [mil]
  rrect38% 13.94x10.34 smd paste+0 mask+0: 1(-10.52,0)
  rrect37% 13.31x10.73 smd paste+0 mask+0: 2(10.52,0)
IND_LQG15H [mm] "MuRata"
  rect 0.55x0.6 smd: 1(-0.475,0) 2(0.475,0)
  silkscreen extent -1.3,-0.3 -0.95,0.3
MHNP_2-5 [mil]
  round 95 hole 100 unplated mask+0: ""(0,0)
  Keep-Out Layer circle w1: c0,0 r100
MHNP_M2_PANHEAD_PHILLIPS [mil]
  round 83 hole 88 unplated mask+0: ""(0,0)
  Keep-Out Layer circle w1: c0,0 r88
RGZ0048A [mm] "VQFN-48"
  rrect42% 0.6x0.24 smd: 1(-3.4,2.75) 2(-3.4,2.25) 3(-3.4,1.75) 4(-3.4,1.25) 5(-3.4,0.75) 6(-3.4,0.25) 7(-3.4,-0.25) 8(-3.4,-0.75) 9(-3.4,-1.25) 10(-3.4,-1.75) 11(-3.4,-2.25) 12(-3.4,-2.75) 25(3.4,-2.75) 26(3.4,-2.25) 27(3.4,-1.75) 28(3.4,-1.25) 29(3.4,-0.75) 30(3.4,-0.25) 31(3.4,0.25) 32(3.4,0.75) 33(3.4,1.25) 34(3.4,1.75) 35(3.4,2.25) 36(3.4,2.75)
  rrect42% 0.24x0.6 smd: 13(-2.75,-3.4) 14(-2.25,-3.4) 15(-1.75,-3.4) 16(-1.25,-3.4) 17(-0.75,-3.4) 18(-0.25,-3.4) 19(0.25,-3.4) 20(0.75,-3.4) 21(1.25,-3.4) 22(1.75,-3.4) 23(2.25,-3.4) 24(2.75,-3.4) 37(2.75,3.4) 38(2.25,3.4) 39(1.75,3.4) 40(1.25,3.4) 41(0.75,3.4) 42(0.25,3.4) 43(-0.25,3.4) 44(-0.75,3.4) 45(-1.25,3.4) 46(-1.75,3.4) 47(-2.25,3.4) 48(-2.75,3.4)
  rrect2% 5.15x5.15 smd paste-2.6: 49(0,0)
RNF0026C [mm] "QFN, 26-Leads, Body 4x4.5mm, Pitch 0.5mm"
  rrect25% 0.6x0.4 smd paste-0.3: 1(-1.9,1.825) 8(-1.9,-1.825) 14(1.9,-1.825) 21(1.9,1.825)
  rrect40% 0.6x0.25 smd paste+0: 2(-1.9,1.25) 3(-1.9,0.75) 4(-1.9,0.25) 5(-1.9,-0.25) 6(-1.9,-0.75) 7(-1.9,-1.25) 15(1.9,-1.25) 16(1.9,-0.75) 17(1.9,-0.25) 18(1.9,0.25) 19(1.9,0.75) 20(1.9,1.25)
  rrect40% 0.25x1.82 smd paste-1: 9(-1,-1.54) 10(-0.5,-1.54) 11(0,-1.54) 12(0.5,-1.54) 13(1,-1.54) 22(1,1.54) 23(0.5,1.54) 24(0,1.54) 25(-0.5,1.54) 26(-1,1.54)
  rrect15% 2.24x0.66 smd paste-1: 27(0,0)
  rrect33% 0.6x0.3 on Top Paste: ""(-1.9,1.775) ""(-1.9,-1.775) ""(1.9,1.775) ""(1.9,-1.775)
  rrect33% 0.3x0.825 on Top Paste: ""(-1.575,2.037) ""(-1.575,-2.037) ""(1.575,2.037) ""(1.575,-2.037)
  rrect40% 0.25x0.81 on Top Paste: ""(-1,1.035) ""(-1,2.045) ""(-1,-2.045) ""(-1,-1.035) ""(-0.5,2.045) ""(-0.5,1.035) ""(-0.5,-1.035) ""(-0.5,-2.045) ""(0,2.045) ""(0,1.035) ""(0,-1.035) ""(0,-2.045) ""(0.5,2.045) ""(0.5,1.035) ""(0.5,-1.035) ""(0.5,-2.045) ""(1,1.035) ""(1,2.045) ""(1,-2.045) ""(1,-1.035)
  rrect15% 0.98x0.66 on Top Paste: ""(-0.59,0) ""(0.59,0)
  silkscreen extent -2.45,-2.7 2.45,2.7
RSE0010A [mm] "QFN, 10-Leads, Body 1.5x2mm, Pitch 0.5mm, TI Recommended"
  rect 0.55x0.2 smd: 1(-0.675,0.75) 2(-0.675,0.25) 3(-0.675,-0.25) 4(-0.675,-0.75) 6(0.675,-0.75) 7(0.675,-0.25) 8(0.675,0.25) 9(0.675,0.75)
  rect 0.3x0.6 smd: 5(0,-0.9) 10(0,0.9)
  silkscreen extent -1.07,-1.17 0.77,1.18
RSV0016A [mm] "QFN, 16-Leads, Body 1.8x2.6mm, Pitch 0.4mm, TI Recommended"
  rect 0.7x0.2 smd: 1(-0.75,0.6)
  rect 0.6x0.2 smd: 2(-0.8,0.2) 3(-0.8,-0.2) 4(-0.8,-0.6) 9(0.8,-0.6) 10(0.8,-0.2) 11(0.8,0.2) 12(0.8,0.6)
  rect 0.2x0.6 smd: 5(-0.6,-1.2) 6(-0.2,-1.2) 7(0.2,-1.2) 8(0.6,-1.2) 13(0.6,1.2) 14(0.2,1.2) 15(-0.2,1.2) 16(-0.6,1.2)
  silkscreen extent -1.08,-1.33 1.08,1.45
RUT0012A [mm] "QFN, 12-Leads, Body 1.7x2mm, Pitch 0.4mm, TI Recommended"
  rrect50% 0.7x0.2 smd: 1(-0.7,0.8) 2(-0.7,0.4) 3(-0.7,0) 4(-0.7,-0.4) 5(-0.7,-0.8) 7(0.7,-0.8) 8(0.7,-0.4) 9(0.7,0) 10(0.7,0.4) 11(0.7,0.8)
  rrect50% 0.2x0.7 smd: 6(0,-0.85) 12(0,0.85)
  silkscreen extent -0.9,-1.2 0.9,1.2
Samtec_QSH-030-01-X-D-A [mm] "Receptacle, 0.5 mm, 30x2, TH"
  rect 2.27x0.279 smd: 1(-2.865,7.25) 2(2.865,7.25) 3(-2.865,6.75) 4(2.865,6.75) 5(-2.865,6.25) 6(2.865,6.25) 7(-2.865,5.75) 8(2.865,5.75) 9(-2.865,5.25) 10(2.865,5.25) 11(-2.865,4.75) 12(2.865,4.75) 13(-2.865,4.25) 14(2.865,4.25) 15(-2.865,3.75) 16(2.865,3.75) 17(-2.865,3.25) 18(2.865,3.25) 19(-2.865,2.75) 20(2.865,2.75) 21(-2.865,2.25) 22(2.865,2.25) 23(-2.865,1.75) 24(2.865,1.75) 25(-2.865,1.25) 26(2.865,1.25) 27(-2.865,0.75) 28(2.865,0.75) 29(-2.865,0.25) 30(2.865,0.25) 31(-2.865,-0.25) 32(2.865,-0.25) 33(-2.865,-0.75) 34(2.865,-0.75) 35(-2.865,-1.25) 36(2.865,-1.25) 37(-2.865,-1.75) 38(2.865,-1.75) 39(-2.865,-2.25) 40(2.865,-2.25) 41(-2.865,-2.75) 42(2.865,-2.75) 43(-2.865,-3.25) 44(2.865,-3.25) 45(-2.865,-3.75) 46(2.865,-3.75) 47(-2.865,-4.25) 48(2.865,-4.25) 49(-2.865,-4.75) 50(2.865,-4.75) 51(-2.865,-5.25) 52(2.865,-5.25) 53(-2.865,-5.75) 54(2.865,-5.75) 55(-2.865,-6.25) 56(2.865,-6.25) 57(-2.865,-6.75) 58(2.865,-6.75) 59(-2.865,-7.25) 60(2.865,-7.25)
  round 0 hole 1.02 unplated: MH1(2.67,10.065) MH2(2.67,-10.065)
  rect 0.43x2.54 smd: MP1(0,8.065) MP4(0,-8.065)
  rect 0.43x4.7 smd: MP2(0,3.175) MP3(0,-3.175)
  silkscreen extent -3.9,-10.66 3.62,10.66
SW_218-4LPST [mil] "CTS Components"
  rect 50x30 smd: 1(-150,75) 2(-150,25) 3(-150,-25) 4(-150,-75) 5(150,-75) 6(150,-25) 7(150,25) 8(150,75)
  silkscreen extent -114,-123 114,123
SW_B3U-1000P [mm] "OMRON"
  rect 0.8x1.7 smd: 1(-1.7,0) 2(1.7,0)
  silkscreen extent -1.5,-1.25 1.5,1.25
TP_25MIL-SMT [mil]
  round 25 smd mask+0: 1(0,0)
TP_SM_1MM [mm] "1mm Test Point, SMT"
  round 1 smd paste-0.5: 1(0,0)
TP_VIA_060RND040 [mil] "TP_VIA_060RND040"
  round 60 hole 40: 1(0,0)
WSON-8L_6x5MM_EP [mm] "SMD, 8-Leads, Body 6x5mm, Pitch 1.27mm"
  rrect25% 0.8x0.4 smd: 1(-2.8,1.905) 2(-2.8,0.635) 3(-2.8,-0.635) 4(-2.8,-1.905) 5(2.8,-1.905) 6(2.8,-0.635) 7(2.8,0.635) 8(2.8,1.905)
  rrect3% 3.4x4 smd paste-3: 9(0,0)
  rrect50% 1.468x1.698 on Bottom Paste: ""(-0.834,-0.949) ""(-0.834,0.949) ""(0.834,-0.949) ""(0.834,0.949)
  silkscreen extent -3.2,-2.7 3.2,2.7